# Altium PCB V3.2_Board.PcbDoc (part 2 of 9)
Units mil, origin at the board's own origin, x right, y up, seen from the top; angles counter-clockwise.
Board outline 7795.28 x 4881.89 mil, 2 copper layers (Top Layer, Bottom Layer), stack 57 mil thick; 419 components, 273 nets, 1244 pads, 414 vias.
Unrouted connection lines stored in the file: 3.
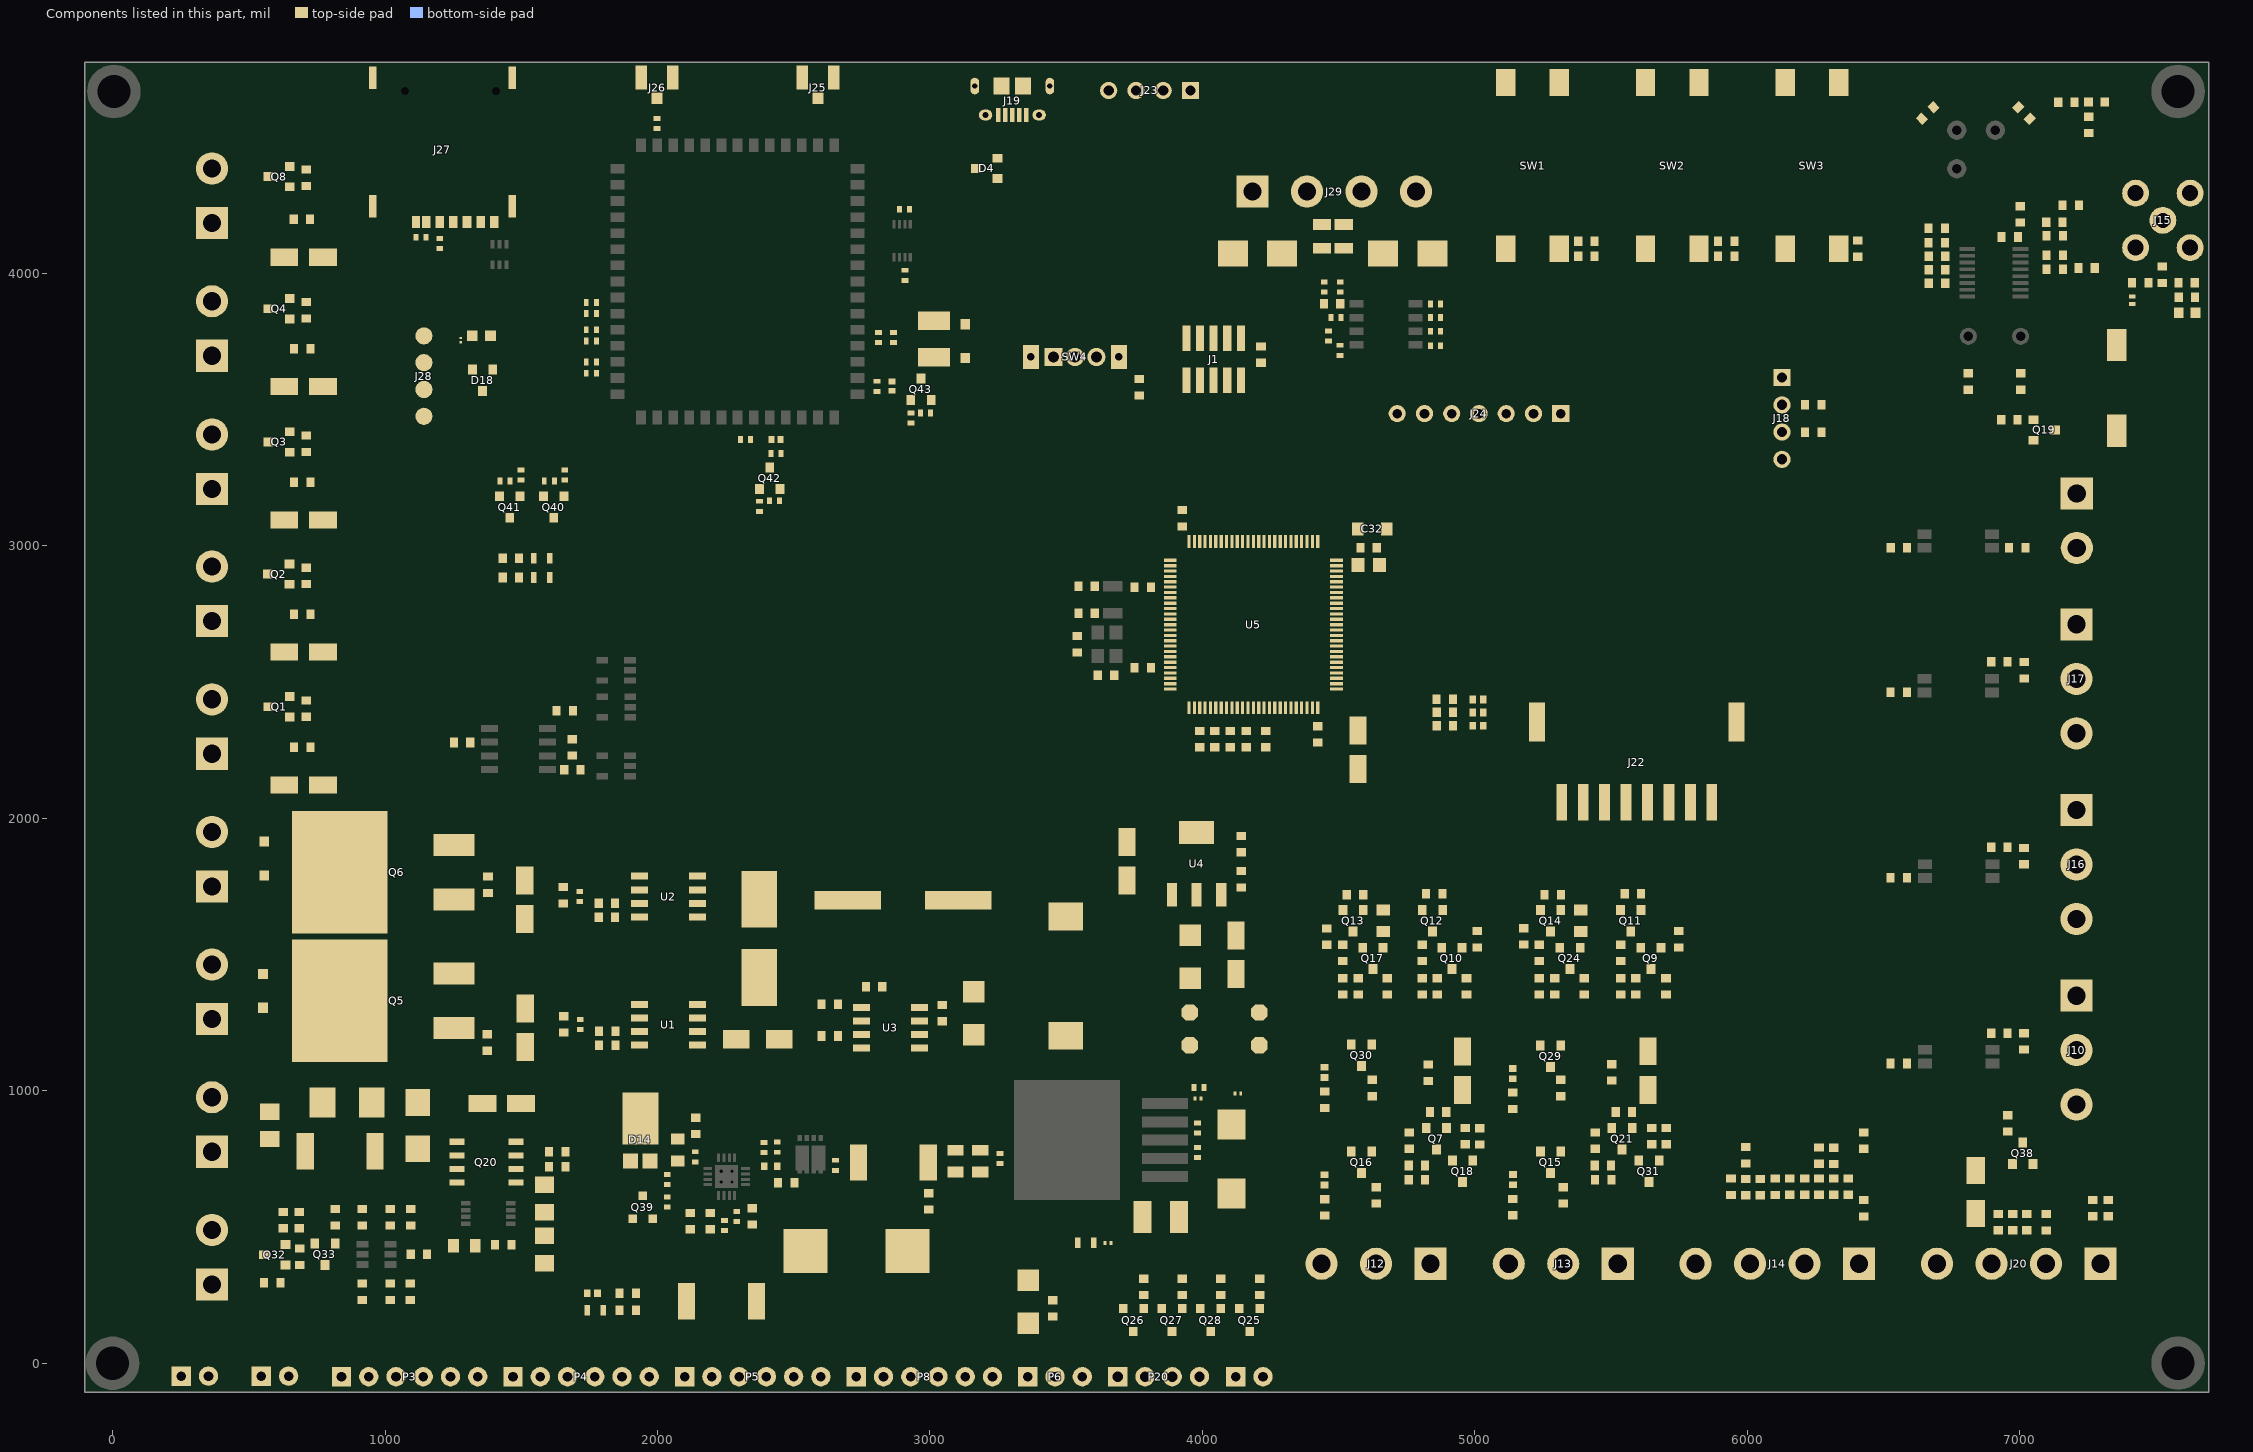
[diagram p2: the components of this part, seen from the top]

## Part data
C1 C4 C17 C21 C23 C24 C31 C43 C58 C61 C63 C65 C67: library part RVT1E100M0405, "CAP ALUM 10uF 25V SMD", Manufacturer=ROQANG, Operating Temperature=-45℃~+105℃, Rated Voltage=25V, Tolerance=±20%, Capacitance=10uF, L=5.4mm, φD=4mm
C2: library part CC1206KKX7R0BB104, "CAP CER 0.1UF 100V X7R 1206", Capacitance=100nF, Case Code (Imperial)=1206, Case Code (Metric)=3216, Dielectric=X7R, Dielectric Material=Ceramic, LCSC Part Number=C107181, Manufacturer=Yageo, Max Operating Temperature=125°C, Min Operating Temperature=-55°C, Package Quantity=1, Tolerance=10%, Voltage=63V, Voltage Rating=100V, Case/Package=1206, Category="Ceramic Capacitors", ComponentLink1Description=https://datasheet.ciiva.com/7978/1447671-7978227.pdf?src-supplier=Element14, ComponentLink1URL=https://datasheet.ciiva.com/7978/1447671-7978227.pdf?src-supplier=Element14, ComponentLink2Description=https://datasheet.ciiva.com/46391/1919308-46391993.pdf?src-supplier=Element14, ComponentLink2URL=https://datasheet.ciiva.com/46391/1919308-46391993.pdf?src-supplier=Element14, ComponentLink3Description=https://datasheet.ciiva.com/180/mlccorderingcode-180145.pdf?src-supplier=Digi-Key, ComponentLink3URL=https://datasheet.ciiva.com/180/mlccorderingcode-180145.pdf?src-supplier=Digi-Key, ComponentLink4Description=https://datasheet.ciiva.com/180/mlccorderingcode-180144.pdf?src-supplier=Digi-Key, ComponentLink4URL=https://datasheet.ciiva.com/180/mlccorderingcode-180144.pdf?src-supplier=Digi-Key, ComponentLink5Description=https://datasheet.ciiva.com/180/mlccorderingcode-180146.pdf?src-supplier=Digi-Key, ComponentLink5URL=https://datasheet.ciiva.com/180/mlccorderingcode-180146.pdf?src-supplier=Digi-Key, ComponentLink6Description=https://datasheet.ciiva.com/5425/upy-gp-np0-16v-to-50v-8-5425573.pdf?src-supplier=Mouser, ComponentLink6URL=https://datasheet.ciiva.com/5425/upy-gp-np0-16v-to-50v-8-5425573.pdf?src-supplier=Mouser, ComponentLink7Description=https://datasheet.ciiva.com/16981/upy-np0x7r-mv-100-to-630v-9-16981180.pdf?src-supplier=Future+Electronics, ComponentLink7URL=https://datasheet.ciiva.com/16981/upy-np0x7r-mv-100-to-630v-9-16981180.pdf?src-supplier=Future+Electronics, ComponentLink8Description=https://datasheet.ciiva.com/26829/getdatasheetpartid-403790-26829655.pdf?src-supplier=Verical, ComponentLink8URL=https://datasheet.ciiva.com/26829/getdatasheetpartid-403790-26829655.pdf?src-supplier=Verical, Depth=1.6mm, Height=1.25mm, Item Type=Capacitor, Lead Free="Lead Free", Length=3.2mm, Manufacturer Part Number=CC1206KKX7R0BB104, Mount="Surface Mount", Number of Pins=2, Packaging="Tape and Reel", Pricing 1="3000=0.01588, 6000=0.01565, 12000=0.01520, 18000=0.01486, 24000=0.01429, 30000=0.01395, 300000=0.01361 (USD)", Radiation Hardening=No, Reach SVHC Compliant=Yes, Resistor Type=Ceramic, RoHS=Yes, RoHS Compliant=Yes, Series=CC, Stock 1=24000, Supplier 1=Avnet, Supplier Part Number 1=CC1206KKX7R0BB104, Termination=SMD/SMT, Thickness=0.057inch, Voltage Rating (DC)=100V, Width=0.063inch
C3 C40 C45 C59: library part CC0603KRX5R8BB105, "CAP CER 1UF 25V X5R 0603", Case Code (Imperial)=0603, Case Code (Metric)=1608, Dielectric=X5R, Manufacturer=Yageo, Max Operating Temperature=85°C, Min Operating Temperature=-55°C, Package Quantity=1, Supplier Part Number 1=311-1445-6-ND, Tolerance=10%, Voltage Rating=25V, Capacitance=1uF, Case/Package=0603, ComponentLink1Description=http://www.yageo.com/documents/recent/UPY-GPHC_X5R_4V-to-50V_25.pdf?src-supplier=Digi-Key, ComponentLink1URL=http://www.yageo.com/documents/recent/UPY-GPHC_X5R_4V-to-50V_25.pdf?src-supplier=Digi-Key, ComponentLink2Description=http://www.yageo.com/documents/recent/UPY-GPHC_X5R_4V-to-50V_12.pdf?src-supplier=Avnet+Europe, ComponentLink2URL=http://www.yageo.com/documents/recent/UPY-GPHC_X5R_4V-to-50V_12.pdf?src-supplier=Avnet+Europe, ComponentLink3Description=http://www.farnell.com/datasheets/1525783.pdf?src-supplier=Element14, ComponentLink3URL=http://www.farnell.com/datasheets/1525783.pdf?src-supplier=Element14, ComponentLink4Description=http://www.yageo.com/documents/recent/UPY-GPHC_X5R_4V-to-50V_12.pdf?src-supplier=Avnet, ComponentLink4URL=http://www.yageo.com/documents/recent/UPY-GPHC_X5R_4V-to-50V_12.pdf?src-supplier=Avnet, Depth=0.8mm, Halogen Free="Halogen Free", Height=0.8mm, Lead Free="Lead Free", Length=1.6mm, Manufacturer Part Number=CC0603KRX5R8BB105, Mount="Surface Mount", Number of Pins=2, Packaging="Tape and Reel", Pricing 1="1=0.1, 10=0.069, 100=0.0307, 500=0.0219, 1000=0.0172 (USD)", Radiation Hardening=No, REACH SVHC="No SVHC", Stock 1=1419041, Supplier 1=Digi-Key, Termination=SMD/SMT, Thickness=0.035inch, Voltage Rating (DC)=25V, Width=0.031inch
C5 C88 C90 C94 C99 C100 C101 C102 C103 C104: library part GRM155R62A104KE14D, "CAP CER 0.1UF 100V X5R 0402", Capacitance=100nF, Case Code (Imperial)=0402, Case Code (Metric)=1005, Dielectric=X5R, LCSC Part Number=C162178, Manufacturer=Murata, Max Operating Temperature=85°C, Min Operating Temperature=-55°C, Package Quantity=10000, Tolerance=10%, Voltage Rating=100V, Case/Package=0402, Category="Ceramic Capacitors", ComponentLink1Description=http://www.farnell.com/datasheets/2079151.pdf?src-supplier=Farnell, ComponentLink1URL=http://www.farnell.com/datasheets/2079151.pdf?src-supplier=Farnell, ComponentLink2Description=http://www.mouser.com/ds/2/281/c02e-2905.pdf?src-supplier=Mouser, ComponentLink2URL=http://www.mouser.com/ds/2/281/c02e-2905.pdf?src-supplier=Mouser, ComponentLink3Description=http://www.farnell.com/datasheets/2079151.pdf?src-supplier=Element14, ComponentLink3URL=http://www.farnell.com/datasheets/2079151.pdf?src-supplier=Element14, ComponentLink4Description=http://search.murata.co.jp/Ceramy/image/img/A01X/G101/ENG/GRM155R62A104KE14-01.pdf?src-supplier=Digi-Key, ComponentLink4URL=http://search.murata.co.jp/Ceramy/image/img/A01X/G101/ENG/GRM155R62A104KE14-01.pdf?src-supplier=Digi-Key, ComponentLink5Description=http://www.farnell.com/datasheets/2079151.pdf?src-supplier=Newark, ComponentLink5URL=http://www.farnell.com/datasheets/2079151.pdf?src-supplier=Newark, Height=0.5mm, Item Type=Capacitor, Lead Free="Lead Free", Length=0.039inch, Manufacturer Part Number=GRM155R62A104KE14D, Mount="Surface Mount", Packaging="Tape and Reel", Pricing 1="10000=0.00500, 20000=0.00410, 30000=0.00390, 50000=0.00370, 100000=0.00300 (USD)", Reach SVHC Compliant=Yes, RoHS=Yes, RoHS Compliant=Yes, Series=GRM, Stock 1=870000, Supplier 1="Arrow Electronics", Supplier Part Number 1=GRM155R62A104KE14D, Termination=SMD/SMT, Thickness=0.022inch, Voltage Rating (DC)=100V, Weight=0.000212oz, Width=0.02inch
C6 C18 C22 C25 C26 C27 C28 C29 C30 C33 C36 C37 C38 C39 C44 C46 C47 C48 C49 C51 C52 C55 C60 C62 C64 C66 C68 C69 C73 C76 C82 C87: library part CC0603ZRY5V9BB104, "CAP CER 0.1UF 50V Y5V 0603", Capacitance=100nF, Case Code (Imperial)=0603, Case Code (Metric)=1608, Dielectric=Y5V, Manufacturer=Yageo, Max Operating Temperature=85°C, Min Operating Temperature=-30°C, Package Quantity=1, Supplier Part Number 1=311-1343-1-ND, Tolerance=80%, Voltage=50V, Case/Package=0603, ComponentLink1Description=http://www.yageo.com/documents/recent/UPY-GPHC_Y5V_6.3V-to-50V_8.pdf?src-supplier=Digi-Key, ComponentLink1URL=http://www.yageo.com/documents/recent/UPY-GPHC_Y5V_6.3V-to-50V_8.pdf?src-supplier=Digi-Key, ComponentLink2Description=http://www.yageo.com/documents/recent/UPY-GPHC_Y5V_6.3V-to-50V_5.pdf?src-supplier=Avnet+Europe, ComponentLink2URL=http://www.yageo.com/documents/recent/UPY-GPHC_Y5V_6.3V-to-50V_5.pdf?src-supplier=Avnet+Europe, ComponentLink3Description=https://www.verical.com/server-webapp/html/getDatasheet?partID=403611&src-supplier=Verical, ComponentLink3URL=https://www.verical.com/server-webapp/html/getDatasheet?partID=403611&src-supplier=Verical, ComponentLink4Description=http://www.mouser.com/ds/2/447/Yageo_UPY-GP_NP0_16V-to-50V_9-358835.pdf?src-supplier=Mouser, ComponentLink4URL=http://www.mouser.com/ds/2/447/Yageo_UPY-GP_NP0_16V-to-50V_9-358835.pdf?src-supplier=Mouser, ComponentLink5Description=http://www.farnell.com/datasheets/1132289.pdf?src-supplier=Element14, ComponentLink5URL=http://www.farnell.com/datasheets/1132289.pdf?src-supplier=Element14, Composition=Ceramic, Depth=0.8mm, Halogen Free="Halogen Free", Height=0.8mm, Lead Free="Lead Free", Length=1.6mm, Manufacturer Part Number=CC0603ZRY5V9BB104, Mount="Surface Mount", Number of Pins=2, Packaging="Tape and Reel", Pricing 1="1=0.1, 10=0.075, 100=0.0334, 500=0.02386, 1000=0.01874 (USD)", Radiation Hardening=No, REACH SVHC="No SVHC", Stock 1=15000880, Supplier 1=Digi-Key, Termination=SMD/SMT, Thickness=0.035inch, Voltage Rating=50V, Voltage Rating (DC)=50V, Width=0.031inch
C9: library part UWX1E101MCL1GB, "CAP ALUM 100UF 20% 25V SMD", Case/Package=Radial, Dielectric Material=Aluminium, Leakage Current=3uA, Manufacturer=Nichicon, Max Operating Temperature=85°C, Min Operating Temperature=-40°C, Package Quantity=1000, Ripple Current=110mA, Supplier Part Number 1=493-2113-6-ND, Tolerance=20%, Voltage=25V, Capacitance=100uF, Category="Aluminum Electrolytic Capacitors", ComponentLink1Description=http://nichicon-us.com/english/products/pdfs/e-uwx.pdf?src-supplier=Digi-Key, ComponentLink1URL=http://nichicon-us.com/english/products/pdfs/e-uwx.pdf?src-supplier=Digi-Key, ComponentLink2Description=http://www.nichicon.co.jp/english/products/pdfs/e-ch_ref.pdf?src-supplier=Mouser, ComponentLink2URL=http://www.nichicon.co.jp/english/products/pdfs/e-ch_ref.pdf?src-supplier=Mouser, ComponentLink3Description=http://www.nichicon.co.jp/english/products/pdfs/e-wx.pdf?src-supplier=Avnet, ComponentLink3URL=http://www.nichicon.co.jp/english/products/pdfs/e-wx.pdf?src-supplier=Avnet, ComponentLink4Description=http://uk.rs-online.com/webdocs/0fa3/0900766b80fa3a90.pdf?src-supplier=RSComponents, ComponentLink4URL=http://uk.rs-online.com/webdocs/0fa3/0900766b80fa3a90.pdf?src-supplier=RSComponents, ComponentLink5Description=http://nichicon-us.com/english/products/pdfs/e-wx.pdf?src-supplier=Future+Electronics, ComponentLink5URL=http://nichicon-us.com/english/products/pdfs/e-wx.pdf?src-supplier=Future+Electronics, ComponentLink6Description=http://www.nichicon.co.jp/english/products/pdfs/e-ch_ref.pdf?src-supplier=Avnet+Europe, ComponentLink6URL=http://www.nichicon.co.jp/english/products/pdfs/e-ch_ref.pdf?src-supplier=Avnet+Europe, ComponentLink7Description=http://www.farnell.com/datasheets/2364658.pdf?src-supplier=Element14, ComponentLink7URL=http://www.farnell.com/datasheets/2364658.pdf?src-supplier=Element14, ComponentLink8Description=https://datasheet.ciiva.com/11778/0900766b80fa3a90-11778418.pdf?src-supplier=RSComponents, ComponentLink8URL=https://datasheet.ciiva.com/11778/0900766b80fa3a90-11778418.pdf?src-supplier=RSComponents, ComponentLink9Description=https://datasheet.ciiva.com/17527/e-wx-17527624.pdf?src-supplier=Avnet+Europe, ComponentLink9URL=https://datasheet.ciiva.com/17527/e-wx-17527624.pdf?src-supplier=Avnet+Europe, ComponentLink10Description=https://datasheet.ciiva.com/5361/e-wx-11809-5361100.pdf?src-supplier=Mouser, ComponentLink10URL=https://datasheet.ciiva.com/5361/e-wx-11809-5361100.pdf?src-supplier=Mouser, ComponentLink11Description=https://datasheet.ciiva.com/28458/1912851-28458684.pdf?src-supplier=Element14, ComponentLink11URL=https://datasheet.ciiva.com/28458/1912851-28458684.pdf?src-supplier=Element14, ComponentLink12Description=https://datasheet.ciiva.com/96/e-wx-96650.pdf?src-supplier=Digi-Key, ComponentLink12URL=https://datasheet.ciiva.com/96/e-wx-96650.pdf?src-supplier=Digi-Key, ComponentLink13Description=https://datasheet.ciiva.com/96/e-wx-96651.pdf?src-supplier=Digi-Key, ComponentLink13URL=https://datasheet.ciiva.com/96/e-wx-96651.pdf?src-supplier=Digi-Key, ComponentLink14Description=https://datasheet.ciiva.com/96/e-wx-96652.pdf?src-supplier=Digi-Key, ComponentLink14URL=https://datasheet.ciiva.com/96/e-wx-96652.pdf?src-supplier=Digi-Key, ComponentLink15Description=https://datasheet.ciiva.com/11687/e-wx-11687148.pdf?src-supplier=Avnet, ComponentLink15URL=https://datasheet.ciiva.com/11687/e-wx-11687148.pdf?src-supplier=Avnet, ComponentLink16Description=https://datasheet.ciiva.com/16512/e-wx-16512638.pdf?src-supplier=Future+Electronics, ComponentLink16URL=https://datasheet.ciiva.com/16512/e-wx-16512638.pdf?src-supplier=Future+Electronics, Construction=Cylindrical, Diameter=8mm, Dissipation Factor=0.14%, Height=5.4mm, Height - Seated (Max)=0.213inch, Lead Diameter=0.8mm, Lead Free="Lead Free", Lead Pitch=2.3mm, Length=5.4mm, Life (Hours)=2000Hour, Manufacturer Part Number=UWX1E101MCL1GB, Mount="Surface Mount", Number of Pins=2, Packaging="Tape and Reel", Polarity=Polar, Pricing 1="1=0.43, 10=0.301, 50=0.211, 100=0.1808, 500=0.13558 (USD)", Pricing 2="1=0.43000, 10=0.30100, 50=0.21100, 100=0.18080, 500=0.13558 (USD)", Radiation Hardening=No, REACH SVHC="No SVHC", Ripple Current (AC)=110mA, RoHS=Yes, RoHS Compliant=Yes, Series=WX, Stock 1=30613, Stock 2=25010, Supplier 1=Digi-Key, Supplier 2=Digi-Key, Supplier Part Number 2=493-2113-1-ND, Termination=SMD/SMT, Voltage Rating=25V, Voltage Rating (DC)=25V, Weight=0.01lb, Width=0.25inch
C11 C19: library part C1005C0G1E102JT000F, "CAP CER 1000PF 25V C0G 0402", LCSC Part Number=C343059, Manufacturer=TDK, Package=0402, ComponentLink1Description=LCSC, ComponentLink1URL=https://www.lcsc.com/product-detail/Multilayer-Ceramic-Capacitors-MLCC-SMD-SMT_TDK-C1005C0G1E102JT000F_C343059.html, Item Type=Capacitor, Manufacturer Part Number=C1005C0G1E102JT000F
C16: library part VT1H471MI135000CE0, "470uF ±20% 50V 12.5mm 13.5mm 1000hrs 105℃ -40℃~+105℃ SMD,12.5x13.5mm Aluminum Electrolytic Capacitors - SMD RoHS", Lifetime @ Temp="1000hrs 105℃", Manufacturer="Changzhou Huawei Elec", Operating Temperature=-40℃~+105℃, Package=SMD,12.5x13.5mm, Rated Voltage=50V, Tolerance=±20%, Capacitance=470uF, L=13.5mm, φD=12.5mm
C20: library part CC0603KRX7R9BB471, "CAP CER 470pF 10% X7R 50V 0603 SMD", Case Code (Imperial)=0603, Case Code (Metric)=1608, Dielectric=X7R, Dielectric Material=Ceramic, Insulation Resistance=10GR, Manufacturer=Yageo, Max Operating Temperature=125°C, Min Operating Temperature=-55°C, Package Quantity=1, Supplier Part Number 1=311-1078-1-ND, Tolerance=10%, Voltage Rating=50V, Capacitance=470pF, Case/Package=0603, Category="Ceramic Capacitors", ComponentLink1Description=https://datasheet.ciiva.com/5425/upy-gphc-x7r-6-3v-to-50v-8-12304-5425461.pdf?src-supplier=Mouser, ComponentLink1URL=https://datasheet.ciiva.com/5425/upy-gphc-x7r-6-3v-to-50v-8-12304-5425461.pdf?src-supplier=Mouser, ComponentLink2Description=https://datasheet.ciiva.com/144/mlccorderingcode-144439.pdf?src-supplier=Digi-Key, ComponentLink2URL=https://datasheet.ciiva.com/144/mlccorderingcode-144439.pdf?src-supplier=Digi-Key, ComponentLink3Description=https://datasheet.ciiva.com/144/mlccorderingcode-144440.pdf?src-supplier=Digi-Key, ComponentLink3URL=https://datasheet.ciiva.com/144/mlccorderingcode-144440.pdf?src-supplier=Digi-Key, ComponentLink4Description=https://datasheet.ciiva.com/11587/upy-gphc-x7r-6-3v-to-50v-8-11587224.pdf?src-supplier=Avnet, ComponentLink4URL=https://datasheet.ciiva.com/11587/upy-gphc-x7r-6-3v-to-50v-8-11587224.pdf?src-supplier=Avnet, ComponentLink5Description=https://datasheet.ciiva.com/144/mlccorderingcode-144441.pdf?src-supplier=Digi-Key, ComponentLink5URL=https://datasheet.ciiva.com/144/mlccorderingcode-144441.pdf?src-supplier=Digi-Key, ComponentLink6Description=https://datasheet.ciiva.com/16623/upy-gphc-x7r-6-3v-to-50v-8-16623897.pdf?src-supplier=Avnet+Europe, ComponentLink6URL=https://datasheet.ciiva.com/16623/upy-gphc-x7r-6-3v-to-50v-8-16623897.pdf?src-supplier=Avnet+Europe, ComponentLink7Description=https://datasheet.ciiva.com/8033/1489800-8033898.pdf?src-supplier=Element14, ComponentLink7URL=https://datasheet.ciiva.com/8033/1489800-8033898.pdf?src-supplier=Element14, ComponentLink8Description=https://datasheet.ciiva.com/8033/1489800-8033899.pdf?src-supplier=Element14, ComponentLink8URL=https://datasheet.ciiva.com/8033/1489800-8033899.pdf?src-supplier=Element14, ComponentLink9Description=https://datasheet.ciiva.com/26829/getdatasheetpartid-251791-26829452.pdf?src-supplier=Verical, ComponentLink9URL=https://datasheet.ciiva.com/26829/getdatasheetpartid-251791-26829452.pdf?src-supplier=Verical, ComponentLink10Description=https://datasheet.ciiva.com/28450/1489800-28450652.pdf?src-supplier=Element14, ComponentLink10URL=https://datasheet.ciiva.com/28450/1489800-28450652.pdf?src-supplier=Element14, ComponentLink11Description=https://datasheet.ciiva.com/8033/70765-8033902.pdf?src-supplier=Element14, ComponentLink11URL=https://datasheet.ciiva.com/8033/70765-8033902.pdf?src-supplier=Element14, Depth=0.8mm, Dissipation Factor=2.5%, Halogen Free="Halogen Free", Height=0.8mm, Lead Free="Lead Free", Length=1.6mm, Manufacturer Part Number=CC0603KRX7R9BB471, Mount="Surface Mount", Number of Pins=2, Packaging="Tape and Reel", Pricing 1="1=0.10000, 10=0.04500, 50=0.02460, 100=0.02010, 500=0.01432, 1000=0.01125 (USD)", Radiation Hardening=No, REACH SVHC="No SVHC", Resistor Type=Ceramic, RoHS=Yes, RoHS Compliant=Yes, Series=CC, Stock 1=2173, Supplier 1=Digi-Key, Termination=SMD/SMT, Thickness=0.035inch, Voltage Rating (DC)=50V, Width=0.8mm
C32: library part T491A105K025AT, "Cap Tant Solid 1uF 25V A CASE 10% (3.2 X 1.6 X 1.6mm) Inward L SMD 3216-18 8 Ohm 125°C T/R", Case Code (Imperial)=1206, Case Code (Metric)=3216, Dielectric Material=Tantalum, ESR (Equivalent Series Resistance)=8R, Leakage Current=500nA, Manufacturer=KEMET, Max Operating Temperature=125°C, Min Operating Temperature=-55°C, Package Quantity=1, Tolerance=20%, Voltage=25V, Capacitance=1uF, Case/Package=1206, Category="Tantalum Capacitors", ComponentLink1Description=https://datasheet.ciiva.com/34302/1573185-34302503.pdf?src-supplier=Jameco, ComponentLink1URL=https://datasheet.ciiva.com/34302/1573185-34302503.pdf?src-supplier=Jameco, ComponentLink2Description=https://datasheet.ciiva.com/7758/1854511-7758878.pdf?src-supplier=Element14, ComponentLink2URL=https://datasheet.ciiva.com/7758/1854511-7758878.pdf?src-supplier=Element14, ComponentLink3Description=https://datasheet.ciiva.com/7758/1446014-7758877.pdf?src-supplier=Element14, ComponentLink3URL=https://datasheet.ciiva.com/7758/1446014-7758877.pdf?src-supplier=Element14, ComponentLink4Description=https://datasheet.ciiva.com/7758/1446014-7758879.pdf?src-supplier=Element14, ComponentLink4URL=https://datasheet.ciiva.com/7758/1446014-7758879.pdf?src-supplier=Element14, ComponentLink5Description=https://datasheet.ciiva.com/5934/1446014-5934519.pdf?src-supplier=Farnell, ComponentLink5URL=https://datasheet.ciiva.com/5934/1446014-5934519.pdf?src-supplier=Farnell, ComponentLink6Description=https://datasheet.ciiva.com/7758/1698764-7758876.pdf?src-supplier=Element14, ComponentLink6URL=https://datasheet.ciiva.com/7758/1698764-7758876.pdf?src-supplier=Element14, ComponentLink7Description=https://datasheet.ciiva.com/257/kem-t2005-t491-257555.pdf?src-supplier=Digi-Key, ComponentLink7URL=https://datasheet.ciiva.com/257/kem-t2005-t491-257555.pdf?src-supplier=Digi-Key, ComponentLink8Description=https://datasheet.ciiva.com/257/kem-t2005-t491-257554.pdf?src-supplier=Digi-Key, ComponentLink8URL=https://datasheet.ciiva.com/257/kem-t2005-t491-257554.pdf?src-supplier=Digi-Key, ComponentLink9Description=https://datasheet.ciiva.com/257/kem-t2005-t491-257556.pdf?src-supplier=Digi-Key, ComponentLink9URL=https://datasheet.ciiva.com/257/kem-t2005-t491-257556.pdf?src-supplier=Digi-Key, ComponentLink10Description=https://datasheet.ciiva.com/14586/70095774-14586698.pdf?src-supplier=Allied+Electronics, ComponentLink10URL=https://datasheet.ciiva.com/14586/70095774-14586698.pdf?src-supplier=Allied+Electronics, ComponentLink11Description=https://datasheet.ciiva.com/18095/getdatasheetpartid-120995-18095948.pdf?src-supplier=Verical, ComponentLink11URL=https://datasheet.ciiva.com/18095/getdatasheetpartid-120995-18095948.pdf?src-supplier=Verical, Depth=1.6mm, Dissipation Factor=4%, Features="General Purpose", Height=1.6mm, Height - Seated (Max)=0.071inch, Lead Free="Lead Free", Lead Pitch=1.2mm, Length=3.2mm, Life (Hours)=2000Hour, Manufacturer Part Number=T491A105K025AT, Mount="Surface Mount,PCB", Number of Pins=2, Packaging="Tape and Reel", Polarity=Polar, Pricing 1="2000=0.09910, 4000=0.09460 (USD)", Radiation Hardening=No, REACH SVHC="No SVHC", RoHS=Yes, RoHS Compliant=Yes, Stock 1=30000, Supplier 1="Arrow Electronics", Supplier Part Number 1=T491A105K025AT, Termination=SMD/SMT, Voltage Rating=25V, Voltage Rating (DC)=25V, Width=1.6mm
C34 C35: library part CC0603JRNPO9BN300, "CAP 30pF NP0 0603 50 V ±5 % SMD", Case Code (Imperial)=0603, Case Code (Metric)=1608, Dielectric=C0G, Insulation Resistance=10GR, Manufacturer=Yageo, Max Operating Temperature=125°C, Min Operating Temperature=-55°C, Resistor Type=Ceramic, Supplier Part Number 1=311-3357-1-ND, Tolerance=5%, Voltage Rating=50V, Capacitance=30pF, Case/Package=0603, Category="Ceramic Capacitors", ComponentLink1Description=https://datasheet.ciiva.com/26862/getdatasheetpartid-403531-26862766.pdf?src-supplier=Verical, ComponentLink1URL=https://datasheet.ciiva.com/26862/getdatasheetpartid-403531-26862766.pdf?src-supplier=Verical, ComponentLink2Description=https://datasheet.ciiva.com/13264/upy-gp-np0-16v-to-50v-8-3714-13264406.pdf?src-supplier=Mouser, ComponentLink2URL=https://datasheet.ciiva.com/13264/upy-gp-np0-16v-to-50v-8-3714-13264406.pdf?src-supplier=Mouser, ComponentLink3Description=https://datasheet.ciiva.com/7978/1132289-7978140.pdf?src-supplier=Element14, ComponentLink3URL=https://datasheet.ciiva.com/7978/1132289-7978140.pdf?src-supplier=Element14, ComponentLink4Description=https://datasheet.ciiva.com/28450/1443161-28450494.pdf?src-supplier=Element14, ComponentLink4URL=https://datasheet.ciiva.com/28450/1443161-28450494.pdf?src-supplier=Element14, Construction=Flat, Depth=0.8mm, Dissipation Factor=0.1%, Height=0.8mm, Lead Free="Lead Free", Length=1.6mm, Manufacturer Part Number=CC0603JRNPO9BN300, Mount="Surface Mount", Number of Pins=2, Packaging="Tape and Reel", Pricing 1="1=0.10000, 10=0.06800, 50=0.03700, 100=0.03020, 500=0.02160, 1000=0.01697 (USD)", Radiation Hardening=No, REACH SVHC="No SVHC", RoHS=Yes, RoHS Compliant=Yes, Series=CC, Stock 1=36700, Supplier 1=Digi-Key, Termination=SMD/SMT, Thickness=0.035inch, Voltage Rating (DC)=50V, Weight=7.1E-05oz, Width=0.031inch
C41 C80 C81 C83 C86: library part UMK105CBJ105MV-F, "CAP CER 1UF 50V X5R 0402", Manufacturer="Taiyo Yuden", Supplier Part Number 1=587-6278-1-ND, ComponentLink1Description=http://www.farnell.com/datasheets/2801300.pdf?src-supplier=Newark, ComponentLink1URL=http://www.farnell.com/datasheets/2801300.pdf?src-supplier=Newark, ComponentLink2Description=http://www.farnell.com/datasheets/2801300.pdf?src-supplier=Farnell, ComponentLink2URL=http://www.farnell.com/datasheets/2801300.pdf?src-supplier=Farnell, ComponentLink3Description="https://ds.yuden.co.jp/TYCOMPAS/ut/detail?pn=UMK105CBJ105MV-F &amp;u=M&src-supplier=Digi-Key", ComponentLink3URL="https://ds.yuden.co.jp/TYCOMPAS/ut/detail?pn=UMK105CBJ105MV-F &amp;u=M&src-supplier=Digi-Key", Lead Free="Lead Free", Manufacturer Part Number=UMK105CBJ105MV-F, Pricing 1="1=0.27, 10=0.184, 50=0.1224, 100=0.104, 500=0.07342, 1000=0.06424, 2500=0.06118, 5000=0.05659 (USD)", RoHS Compliant=Yes, Stock 1=412061, Supplier 1=Digi-Key
C42 C79: library part CC0603KRX5R8BB105, "CAP CER 1UF 25V X5R 0603", Case Code (Imperial)=0603, Case Code (Metric)=1608, Dielectric=X5R, LCSC Part Number=C14664, Manufacturer=Yageo, Max Operating Temperature=85°C, Min Operating Temperature=-55°C, Package Quantity=1, Supplier Part Number 1=311-1445-1-ND, Tolerance=10%, Voltage Rating=25V, Capacitance=1uF, Case/Package=0603, Category="Ceramic Capacitors", ComponentLink1Description=https://datasheet.ciiva.com/176/mlccorderingcode-176785.pdf?src-supplier=Digi-Key, ComponentLink1URL=https://datasheet.ciiva.com/176/mlccorderingcode-176785.pdf?src-supplier=Digi-Key, ComponentLink2Description=https://datasheet.ciiva.com/176/mlccorderingcode-176786.pdf?src-supplier=Digi-Key, ComponentLink2URL=https://datasheet.ciiva.com/176/mlccorderingcode-176786.pdf?src-supplier=Digi-Key, ComponentLink3Description=https://datasheet.ciiva.com/176/mlccorderingcode-176787.pdf?src-supplier=Digi-Key, ComponentLink3URL=https://datasheet.ciiva.com/176/mlccorderingcode-176787.pdf?src-supplier=Digi-Key, ComponentLink4Description=https://datasheet.ciiva.com/17436/upy-gphc-x5r-4v-to-50v-12-17436952.pdf?src-supplier=Avnet+Europe, ComponentLink4URL=https://datasheet.ciiva.com/17436/upy-gphc-x5r-4v-to-50v-12-17436952.pdf?src-supplier=Avnet+Europe, ComponentLink5Description=https://datasheet.ciiva.com/7978/1525783-7978171.pdf?src-supplier=Element14, ComponentLink5URL=https://datasheet.ciiva.com/7978/1525783-7978171.pdf?src-supplier=Element14, ComponentLink6Description=https://datasheet.ciiva.com/11586/upy-gphc-x5r-4v-to-50v-12-11586318.pdf?src-supplier=Avnet, ComponentLink6URL=https://datasheet.ciiva.com/11586/upy-gphc-x5r-4v-to-50v-12-11586318.pdf?src-supplier=Avnet, Construction=Flat, Depth=0.8mm, Halogen Free="Halogen Free", Height=0.8mm, Lead Free="Lead Free", Length=1.6mm, Manufacturer Part Number=CC0603KRX5R8BB105, Mount="Surface Mount", Number of Pins=2, Packaging="Tape and Reel", Pricing 1="1=0.12000, 10=0.08400, 50=0.04760, 100=0.03940, 500=0.02764, 1000=0.02288 (USD)", Radiation Hardening=No, REACH SVHC="No SVHC", RoHS=Yes, RoHS Compliant=Yes, Series=CC, Stock 1=919939, Supplier 1=Digi-Key, Termination=SMD/SMT, Thickness=0.035inch, Voltage Rating (DC)=25V, Width=0.031inch
C50 C54: library part CC0603ZRY5V9BB104, "CAP CER 0.1UF 50V Y5V 0603", Capacitance=100nF, Case Code (Imperial)=0603, Case Code (Metric)=1608, Dielectric=Y5V, LCSC Part Number=C106221, Manufacturer=Yageo, Max Operating Temperature=85°C, Min Operating Temperature=-30°C, Package Quantity=1, Supplier Part Number 1=311-1343-1-ND, Tolerance=80%, Voltage=50V, Case/Package=0603, ComponentLink1Description=http://www.yageo.com/documents/recent/UPY-GPHC_Y5V_6.3V-to-50V_8.pdf?src-supplier=Digi-Key, ComponentLink1URL=http://www.yageo.com/documents/recent/UPY-GPHC_Y5V_6.3V-to-50V_8.pdf?src-supplier=Digi-Key, ComponentLink2Description=http://www.yageo.com/documents/recent/UPY-GPHC_Y5V_6.3V-to-50V_5.pdf?src-supplier=Avnet+Europe, ComponentLink2URL=http://www.yageo.com/documents/recent/UPY-GPHC_Y5V_6.3V-to-50V_5.pdf?src-supplier=Avnet+Europe, ComponentLink3Description=https://www.verical.com/server-webapp/html/getDatasheet?partID=403611&src-supplier=Verical, ComponentLink3URL=https://www.verical.com/server-webapp/html/getDatasheet?partID=403611&src-supplier=Verical, ComponentLink4Description=http://www.mouser.com/ds/2/447/Yageo_UPY-GP_NP0_16V-to-50V_9-358835.pdf?src-supplier=Mouser, ComponentLink4URL=http://www.mouser.com/ds/2/447/Yageo_UPY-GP_NP0_16V-to-50V_9-358835.pdf?src-supplier=Mouser, ComponentLink5Description=http://www.farnell.com/datasheets/1132289.pdf?src-supplier=Element14, ComponentLink5URL=http://www.farnell.com/datasheets/1132289.pdf?src-supplier=Element14, Composition=Ceramic, Depth=0.8mm, Halogen Free="Halogen Free", Height=0.8mm, Item Type=Capacitor, Lead Free="Lead Free", Length=1.6mm, Manufacturer Part Number=CC0603ZRY5V9BB104, Mount="Surface Mount", Number of Pins=2, Packaging="Tape and Reel", Pricing 1="1=0.1, 10=0.075, 100=0.0334, 500=0.02386, 1000=0.01874 (USD)", Radiation Hardening=No, REACH SVHC="No SVHC", Stock 1=15000880, Supplier 1=Digi-Key, Termination=SMD/SMT, Thickness=0.035inch, Voltage Rating=50V, Voltage Rating (DC)=50V, Width=0.031inch
C53 C78: library part CC0603JRNPO9BN200, "CAP CER 20PF 50V C0G/NPO 0603", Case Code (Imperial)=0603, Case Code (Metric)=1608, Dielectric=C0G, Manufacturer=Yageo, Max Operating Temperature=125°C, Min Operating Temperature=-55°C, Package Quantity=4000, Supplier Part Number 1=311-1424-1-ND, Tolerance=5%, Voltage Rating=50V, Capacitance=20pF, Case/Package=0603, ComponentLink1Description=http://www.farnell.com/datasheets/1132289.pdf?src-supplier=Element14, ComponentLink1URL=http://www.farnell.com/datasheets/1132289.pdf?src-supplier=Element14, ComponentLink2Description=http://www.yageo.com/documents/recent/UPY-GP_NP0_16V-to-50V_16.pdf?src-supplier=Digi-Key, ComponentLink2URL=http://www.yageo.com/documents/recent/UPY-GP_NP0_16V-to-50V_16.pdf?src-supplier=Digi-Key, Composition=Ceramic, Depth=0.8mm, Lead Free="Lead Free", Length=1.6mm, Manufacturer Part Number=CC0603JRNPO9BN200, Mount="Surface Mount", Number of Pins=2, Packaging="Tape and Reel", Pricing 1="1=0.1, 10=0.046, 100=0.0205, 500=0.01466, 1000=0.01152 (USD)", REACH SVHC=Unknown, Stock 1=180060, Supplier 1=Digi-Key, Termination=SMD/SMT, Thickness=0.035inch, Voltage Rating (DC)=50V, Weight=7.1E-05oz, Width=0.8mm
C56: library part CC1206JRX7R0BB473, "CAP CER 0.047UF 100V X7R 1206", Capacitance=47nF, Case Code (Imperial)=1206, Case Code (Metric)=3216, Dielectric=X7R, LCSC Part Number=C577197, Manufacturer=Yageo, Max Operating Temperature=125°C, Min Operating Temperature=-55°C, Resistor Type=Ceramic, Tolerance=5%, Voltage Rating=100V, Case/Package=1206, Category="Ceramic Capacitors", ComponentLink1Description=https://datasheet.ciiva.com/11465/upy-np0x7r-mv-100-to-630v-9-11465413.pdf?src-supplier=Avnet, ComponentLink1URL=https://datasheet.ciiva.com/11465/upy-np0x7r-mv-100-to-630v-9-11465413.pdf?src-supplier=Avnet, ComponentLink2Description=https://datasheet.ciiva.com/13210/upy-gp-np0-16v-to-50v-8-13210277.pdf?src-supplier=Mouser, ComponentLink2URL=https://datasheet.ciiva.com/13210/upy-gp-np0-16v-to-50v-8-13210277.pdf?src-supplier=Mouser, Construction=Flat, Depth=1.6mm, Height=0.85mm, Item Type=Capacitor, Length=3.2mm, Manufacturer Part Number=CC1206JRX7R0BB473, Mount="Surface Mount", Packaging="Tape and Reel", Pricing 1="1=0.21620, 10=0.10530, 25=0.10420, 100=0.08480, 250=0.08390, 500=0.05860, 1000=0.05090, 3000=0.04900, 6000=0.02930 (USD)", Radiation Hardening=No, RoHS=Yes, RoHS Compliant=Yes, Series=CC, Stock 1=6600, Supplier 1="Arrow Electronics", Supplier Part Number 1=CC1206JRX7R0BB473, Termination=SMD/SMT, Thickness=0.037inch, Voltage Rating (DC)=100V, Width=1.6mm
C57: library part GRM188R6YA106MA73D, "CAP CER 10UF 35V X5R 0603", Case Code (Imperial)=0603, Case Code (Metric)=1608, Dielectric=X5R, Manufacturer=Murata, Max Operating Temperature=85°C, Min Operating Temperature=-55°C, Tolerance=20%, Voltage Rating=35V, Capacitance=10uF, Case/Package=0603, Category="Ceramic Capacitors", ComponentLink1Description=http://search.murata.co.jp/Ceramy/image/img/A01X/G101/ENG/GRM188R6YA106MA73-01.pdf?src-supplier=Future+Electronics, ComponentLink1URL=http://search.murata.co.jp/Ceramy/image/img/A01X/G101/ENG/GRM188R6YA106MA73-01.pdf?src-supplier=Future+Electronics, ComponentLink2Description=http://search.murata.co.jp/Ceramy/image/img/A01X/G101/ENG/GRM188R6YA106MA73-01.pdf?src-supplier=Digi-Key, ComponentLink2URL=http://search.murata.co.jp/Ceramy/image/img/A01X/G101/ENG/GRM188R6YA106MA73-01.pdf?src-supplier=Digi-Key, ComponentLink3Description=https://www.murata.com/~/media/webrenewal/support/library/catalog/products/capacitor/mlcc/c02e.ashx?la=en-us&src-supplier=Digi-Key, ComponentLink3URL=https://www.murata.com/~/media/webrenewal/support/library/catalog/products/capacitor/mlcc/c02e.ashx?la=en-us&src-supplier=Digi-Key, ComponentLink4Description=http://search.murata.co.jp/Ceramy/image/img/A01X/G101/ENG/GRM188R6YA106MA73-01.pdf?src-supplier=Mouser, ComponentLink4URL=http://search.murata.co.jp/Ceramy/image/img/A01X/G101/ENG/GRM188R6YA106MA73-01.pdf?src-supplier=Mouser, ComponentLink5Description=http://search.murata.co.jp/Ceramy/image/img/A01X/G101/ENG/GRM188R6YA106MA73-01.pdf?src-supplier=TTI, ComponentLink5URL=http://search.murata.co.jp/Ceramy/image/img/A01X/G101/ENG/GRM188R6YA106MA73-01.pdf?src-supplier=TTI, Length=0.063inch, Manufacturer Part Number=GRM188R6YA106MA73D, Mount="Surface Mount", Packaging="Tape and Reel", Pricing 1="1=0.36820, 10=0.23680, 25=0.23460, 100=0.15100, 250=0.14950, 500=0.10790, 1000=0.09360, 3000=0.08750, 6000=0.07770, 15000=0.07250, 30000=0.06740 (USD)", RoHS=Yes, RoHS Compliant=Yes, Stock 1=38881, Supplier 1="Arrow Electronics", Supplier Part Number 1=GRM188R6YA106MA73D, Thickness=0.039inch, Voltage Rating (DC)=35V, Width=0.031inch
C70: library part UMK107B7474KA-TR, "CAP CER 0.47uF 50V X7R 0603", Capacitance=470nF, Case Code (Imperial)=0603, Case Code (Metric)=1608, Dielectric=X7R, Manufacturer="Taiyo Yuden", Max Operating Temperature=125°C, Min Operating Temperature=-55°C, Package Quantity=1, Supplier Part Number 1=587-3170-1-ND, Tolerance=10%, Voltage=50V, Case/Package=0603, Category="Ceramic Capacitors", ComponentLink1Description=https://datasheet.ciiva.com/30063/972umk107b7474ka-tr-30063804.pdf?src-supplier=Onlinecomponents.com, ComponentLink1URL=https://datasheet.ciiva.com/30063/972umk107b7474ka-tr-30063804.pdf?src-supplier=Onlinecomponents.com, ComponentLink2Description=https://datasheet.ciiva.com/11600/umk107b7474ka-tr-ss-11600367.pdf?src-supplier=Avnet, ComponentLink2URL=https://datasheet.ciiva.com/11600/umk107b7474ka-tr-ss-11600367.pdf?src-supplier=Avnet, ComponentLink3Description=https://datasheet.ciiva.com/15922/257umk107b7474ka-tr-15922607.pdf?src-supplier=Onlinecomponents.com, ComponentLink3URL=https://datasheet.ciiva.com/15922/257umk107b7474ka-tr-15922607.pdf?src-supplier=Onlinecomponents.com, ComponentLink4Description=https://datasheet.ciiva.com/6274/mlcc-all-e-6274710.pdf?src-supplier=Digi-Key, ComponentLink4URL=https://datasheet.ciiva.com/6274/mlcc-all-e-6274710.pdf?src-supplier=Digi-Key, ComponentLink5Description=https://datasheet.ciiva.com/5412/mlcc01-e-5412119.pdf?src-supplier=Mouser, ComponentLink5URL=https://datasheet.ciiva.com/5412/mlcc01-e-5412119.pdf?src-supplier=Mouser, ComponentLink6Description=https://datasheet.ciiva.com/6274/mlcc-all-e-6274712.pdf?src-supplier=Digi-Key, ComponentLink6URL=https://datasheet.ciiva.com/6274/mlcc-all-e-6274712.pdf?src-supplier=Digi-Key, ComponentLink7Description=https://datasheet.ciiva.com/6274/mlcc-all-e-6274713.pdf?src-supplier=Digi-Key, ComponentLink7URL=https://datasheet.ciiva.com/6274/mlcc-all-e-6274713.pdf?src-supplier=Digi-Key, Construction=Flat, Depth=0.8mm, Halogen Free="Halogen Free", Height=0.8mm, Lead Free="Lead Free", Length=1.6mm, Manufacturer Part Number=UMK107B7474KA-TR, Mount="Surface Mount", Packaging="Tape and Reel", Pricing 1="1=0.21000, 10=0.14800, 50=0.08400, 100=0.06950, 500=0.04876, 1000=0.04036 (USD)", Radiation Hardening=No, RoHS=Yes, RoHS Compliant=Yes, Series=M, Stock 1=81, Supplier 1=Digi-Key, Termination=SMD/SMT, Thickness=0.035inch, Voltage Rating=50V, Voltage Rating (DC)=50V, Width=0.031inch
C71 C72: library part CC0603JRNPO9BN200, "CAP CER 20PF 50V C0G/NPO 0603", Case Code (Imperial)=0603, Case Code (Metric)=1608, Dielectric=C0G, LCSC Part Number=C105621, Manufacturer=Yageo, Max Operating Temperature=125°C, Min Operating Temperature=-55°C, Package Quantity=4000, Supplier Part Number 1=311-1424-6-ND, Tolerance=5%, Voltage Rating=50V, Capacitance=20pF, Case/Package=0603, ComponentLink1Description=http://www.farnell.com/datasheets/1132289.pdf?src-supplier=Element14, ComponentLink1URL=http://www.farnell.com/datasheets/1132289.pdf?src-supplier=Element14, ComponentLink2Description=http://www.yageo.com/documents/recent/UPY-GP_NP0_16V-to-50V_16.pdf?src-supplier=Digi-Key, ComponentLink2URL=http://www.yageo.com/documents/recent/UPY-GP_NP0_16V-to-50V_16.pdf?src-supplier=Digi-Key, Composition=Ceramic, Depth=0.8mm, Lead Free="Lead Free", Length=1.6mm, Manufacturer Part Number=CC0603JRNPO9BN200, Mount="Surface Mount", Number of Pins=2, Packaging="Tape and Reel", Pricing 1="1=0.1, 10=0.048, 100=0.0214, 500=0.01526, 1000=0.01198 (USD)", REACH SVHC=Unknown, Stock 1=259568, Supplier 1=Digi-Key, Termination=SMD/SMT, Thickness=0.035inch, Voltage Rating (DC)=50V, Weight=7.1E-05oz, Width=0.8mm
C74: library part CC0603CRNPO9BN1R2, "CAP CER 1.2PF 50V C0G/NPO 0603", Case Code (Imperial)=0603, Case Code (Metric)=1608, Dielectric=C0G, Insulation Resistance=10GR, Manufacturer=Yageo, Max Operating Temperature=125°C, Min Operating Temperature=-55°C, Package Quantity=4000, Resistor Type=Ceramic, Voltage Rating=50V, Capacitance=1.2pF, Case/Package=0603, Category="Ceramic Capacitors", ComponentLink1Description=https://datasheet.ciiva.com/26862/getdatasheetpartid-403496-26862685.pdf?src-supplier=Verical, ComponentLink1URL=https://datasheet.ciiva.com/26862/getdatasheetpartid-403496-26862685.pdf?src-supplier=Verical, ComponentLink2Description=https://datasheet.ciiva.com/13209/upy-gp-np0-16v-to-50v-8-13209833.pdf?src-supplier=Mouser, ComponentLink2URL=https://datasheet.ciiva.com/13209/upy-gp-np0-16v-to-50v-8-13209833.pdf?src-supplier=Mouser, ComponentLink3Description=https://datasheet.ciiva.com/8033/1443161-8033679.pdf?src-supplier=Element14, ComponentLink3URL=https://datasheet.ciiva.com/8033/1443161-8033679.pdf?src-supplier=Element14, ComponentLink4Description=https://datasheet.ciiva.com/8033/1443161-8033677.pdf?src-supplier=Element14, ComponentLink4URL=https://datasheet.ciiva.com/8033/1443161-8033677.pdf?src-supplier=Element14, ComponentLink5Description=https://datasheet.ciiva.com/11586/upy-gp-np0-16v-to-50v-8-11586438.pdf?src-supplier=Avnet, ComponentLink5URL=https://datasheet.ciiva.com/11586/upy-gp-np0-16v-to-50v-8-11586438.pdf?src-supplier=Avnet, Depth=0.8mm, Height=0.8mm, Lead Free="Lead Free", Length=1.6mm, Manufacturer Part Number=CC0603CRNPO9BN1R2, Mount="Surface Mount", Packaging="Tape and Reel", Pricing 1="4000=0.00980, 8000=0.00850, 12000=0.00840, 40000=0.00420 (USD)", Radiation Hardening=No, REACH SVHC="No SVHC", RoHS=Yes, RoHS Compliant=Yes, Series=CC, Stock 1=8000, Supplier 1="Arrow Electronics", Supplier Part Number 1=CC0603CRNPO9BN1R2, Termination=SMD/SMT, Thickness=0.035inch, Voltage Rating (DC)=50V, Weight=7.1E-05oz, Width=0.031inch
C75: library part UMK107BBJ225MA-T, "CAP CER 2.2UF 50V X5R 0603", Manufacturer="Taiyo Yuden", Supplier Part Number 1=587-6298-1-ND, Category="Ceramic Capacitors", Manufacturer Part Number=UMK107BBJ225MA-T, Pricing 1="1=0.26000, 10=0.18100, 50=0.12060, 100=0.10240, 500=0.07232, 1000=0.06327 (USD)", RoHS=Yes, RoHS Compliant=Yes, Stock 1=1, Supplier 1=Digi-Key
C77: library part CC0603CRNPO9BN1R5, "CAP CER 1.5PF 50V C0G/NPO 0603", Case Code (Imperial)=0603, Case Code (Metric)=1608, Dielectric=C0G, Insulation Resistance=10GR, Manufacturer=Yageo, Max Operating Temperature=125°C, Min Operating Temperature=-55°C, Package Quantity=1, Supplier Part Number 1=311-1050-6-ND, Temperature Coefficient=30ppm/°C, Voltage=50V, Capacitance=1.5pF, Case/Package=0603, ComponentLink1Description=http://www.yageo.com/documents/recent/UPY-GP_NP0_16V-to-50V_16.pdf?src-supplier=Digi-Key, ComponentLink1URL=http://www.yageo.com/documents/recent/UPY-GP_NP0_16V-to-50V_16.pdf?src-supplier=Digi-Key, ComponentLink2Description=http://www.yageo.com/exep/pages/download/literatures/ProductSelectionGuide%202014_Final_2.pdf?src-supplier=Digi-Key, ComponentLink2URL=http://www.yageo.com/exep/pages/download/literatures/ProductSelectionGuide%202014_Final_2.pdf?src-supplier=Digi-Key, ComponentLink3Description=http://www.mouser.com/ds/2/447/Yageo_UPY-GP_NP0_16V-to-50V_9-358835.pdf?src-supplier=Mouser, ComponentLink3URL=http://www.mouser.com/ds/2/447/Yageo_UPY-GP_NP0_16V-to-50V_9-358835.pdf?src-supplier=Mouser, ComponentLink4Description=http://www.yageo.com/documents/recent/UPY-GP_NP0_16V-to-50V_8.pdf?src-supplier=Avnet, ComponentLink4URL=http://www.yageo.com/documents/recent/UPY-GP_NP0_16V-to-50V_8.pdf?src-supplier=Avnet, ComponentLink5Description=http://www.yageo.com/documents/recent/UPY-GP_NP0_16V-to-50V_8.pdf?src-supplier=Avnet+Europe, ComponentLink5URL=http://www.yageo.com/documents/recent/UPY-GP_NP0_16V-to-50V_8.pdf?src-supplier=Avnet+Europe, ComponentLink6Description=https://www.verical.com/server-webapp/html/getDatasheet?partID=38063&src-supplier=Verical, ComponentLink6URL=https://www.verical.com/server-webapp/html/getDatasheet?partID=38063&src-supplier=Verical, Composition=Ceramic, Depth=0.8mm, Height=0.8mm, Lead Free="Lead Free", Length=1.6mm, Manufacturer Part Number=CC0603CRNPO9BN1R5, Mount="Surface Mount", Packaging="Tape and Reel", Pricing 1="1=0.1, 10=0.058, 100=0.0259, 500=0.01852, 1000=0.01455 (USD)", Radiation Hardening=No, REACH SVHC=Unknown, Stock 1=34794, Supplier 1=Digi-Key, Termination=SMD/SMT, Thickness=0.035inch, Voltage Rating=50V, Voltage Rating (DC)=50V, Weight=7.1E-05oz, Width=0.031inch
C84 C85: library part C2012X5R1V226MT000E, "CAP CER 22UF 35V X5R 0805", LCSC Part Number=C338080, Manufacturer="TDK Corporation", Package=0805, ComponentLink1Description=LCSC, ComponentLink1URL=https://www.lcsc.com/product-detail/Multilayer-Ceramic-Capacitors-MLCC-SMD-SMT_TDK-C2012X5R1V226M125AC_C2179409.html, Item Type=Capacitor, Manufacturer Part Number=C2012X5R1V226MT000E
C89: library part TAJE337M016RNJ, "CAP TANT 330UF 20% 16V 2917", Case Code (Imperial)=2917, Case Code (Metric)=7343, ESR (Equivalent Series Resistance)=400mR, LCSC Part Number=C51599, Leakage Current=52.8uA, Manufacturer="Kyocera AVX", Max Operating Temperature=125°C, Min Operating Temperature=-55°C, Tolerance=20%, Voltage Rating=16V, Case/Package=2917, Category="Tantalum Capacitors", ComponentLink1Description=https://datasheet.ciiva.com/12882/taj-27497-12882412.pdf?src-supplier=Mouser, ComponentLink1URL=https://datasheet.ciiva.com/12882/taj-27497-12882412.pdf?src-supplier=Mouser, Dissipation Factor=30%, Features="General Purpose", Height=4.3mm, Item Type=Capacitor, Lead Free="Lead Free", Length=7.3mm, Manufacturer Part Number=TAJE337M016RNJ, Mounting Technology="Surface Mount", Packaging="Tape and Reel", Pricing 1="400=1.8678, 2000=1.7998, 4000=1.7657, 6000=1.7481, 10000=1.7306, 30000=1.7133, 50000=1.6961 (USD)", RoHS=Yes, RoHS Compliant=Yes, Series=TAJ, Stock 1=4000, Supplier 1="Arrow Electronics", Supplier Part Number 1=TAJE337M016RNJ, Termination=SMD/SMT, Voltage Rating (DC)=16V, Width=4.3mm
C91: library part TAJB107M010RNJ, "CAP TANT 100UF 20% 10V 1411", Case Code (Imperial)=1210, Case Code (Metric)=3528, Dielectric Material=Tantalum, ESR (Equivalent Series Resistance)=1.4R, LCSC Part Number=C7196, Leakage Current=10uA, Manufacturer="Kyocera AVX", Max Operating Temperature=125°C, Min Operating Temperature=-55°C, Package Quantity=2000, Supplier Part Number 1=1354069, Tolerance=10%, Voltage=10V, Case/Package=1210, Category="Tantalum Capacitors", ComponentLink1Description=https://datasheet.ciiva.com/264/taj-264281.pdf?src-supplier=Digi-Key, ComponentLink1URL=https://datasheet.ciiva.com/264/taj-264281.pdf?src-supplier=Digi-Key, ComponentLink2Description=https://datasheet.ciiva.com/264/taj-264280.pdf?src-supplier=Digi-Key, ComponentLink2URL=https://datasheet.ciiva.com/264/taj-264280.pdf?src-supplier=Digi-Key, ComponentLink3Description=https://datasheet.ciiva.com/264/taj-264282.pdf?src-supplier=Digi-Key, ComponentLink3URL=https://datasheet.ciiva.com/264/taj-264282.pdf?src-supplier=Digi-Key, ComponentLink4Description=https://datasheet.ciiva.com/11225/taj-11225964.pdf?src-supplier=Avnet, ComponentLink4URL=https://datasheet.ciiva.com/11225/taj-11225964.pdf?src-supplier=Avnet, ComponentLink5Description=https://datasheet.ciiva.com/11225/taj-11225963.pdf?src-supplier=Avnet, ComponentLink5URL=https://datasheet.ciiva.com/11225/taj-11225963.pdf?src-supplier=Avnet, Construction=Flat, Depth=2.8mm, Dissipation Factor=8%, Features="General Purpose", Height=2.1mm, Item Type=Capacitor, Lead Free="Lead Free", Length=3.5mm, Manufacturer Part Number=TAJB107M010RNJ, Mounting Technology="Surface Mount", Packaging="Tape and Reel", Pricing 1="2000=0.302 (GBP)", Radiation Hardening=No, Reach SVHC Compliant=No, RoHS=Yes, RoHS Compliant=Yes, Series=TAJ, Stock 1=17520, Supplier 1=Rs, Termination=SMD/SMT, Voltage Rating=10V, Voltage Rating (DC)=10V, Width=2.8mm
C92: library part GRM1555C1E330JA01D, "CAP CER 33PF 25V C0G/NP0 0402", Case Code (Imperial)=0402, Case Code (Metric)=1005, Dielectric=C0G, LCSC Part Number=C441758, Manufacturer=Murata, Max Operating Temperature=125°C, Min Operating Temperature=-55°C, Package Quantity=1, Supplier Part Number 1=490-6177-1-ND, Tolerance=5%, Voltage=25V, Capacitance=33pF, Case/Package=0402, ComponentLink1Description=https://www.murata.com/~/media/webrenewal/support/library/catalog/products/capacitor/mlcc/c02e.ashx?la=en-us&src-supplier=Digi-Key, ComponentLink1URL=https://www.murata.com/~/media/webrenewal/support/library/catalog/products/capacitor/mlcc/c02e.ashx?la=en-us&src-supplier=Digi-Key, ComponentLink2Description=http://www.mouser.com/ds/2/281/c02e-2905.pdf?src-supplier=Mouser, ComponentLink2URL=http://www.mouser.com/ds/2/281/c02e-2905.pdf?src-supplier=Mouser, ComponentLink3Description=http://psearch.murata.com/capacitor/product/GRM1555C1E330JA01%23.pdf?src-supplier=Avnet, ComponentLink3URL=http://psearch.murata.com/capacitor/product/GRM1555C1E330JA01%23.pdf?src-supplier=Avnet, Construction=Flat, Depth=0.5mm, Height=0.5mm, Lead Free="Lead Free", Length=1mm, Manufacturer Part Number=GRM1555C1E330JA01D, Mount="Surface Mount", Packaging="Tape and Reel", Pricing 1="1=0.1, 10=0.034, 50=0.0184, 100=0.0151, 500=0.01078, 1000=0.00847, 2500=0.0077, 5000=0.00708 (USD)", Radiation Hardening=No, RoHS Compliant=Yes, Series=GRM, Stock 1=250773, Supplier 1=Digi-Key, Termination=SMD/SMT, Thickness=0.022inch, Voltage Rating=25V, Voltage Rating (DC)=25V, Width=0.02inch
C93: library part TLJB227M006R0500, "CAP TANT 220UF 20% 6.3V SMD", Case Code (Imperial)=1411, Case Code (Metric)=3528, Case/Package=1210, Dielectric Material=Tantalum, ESR (Equivalent Series Resistance)=500mR, LCSC Part Number=C30242, Leakage Current=13.2uA, Manufacturer="Kyocera AVX", Max Operating Temperature=125°C, Min Operating Temperature=-55°C, Package Quantity=2000, Ripple Current=412mA, Tolerance=20%, Voltage Rating=6.3V, Category="Tantalum Capacitors", ComponentLink1Description=https://datasheet.ciiva.com/7773/tlj-7773835.pdf?src-supplier=Element14, ComponentLink1URL=https://datasheet.ciiva.com/7773/tlj-7773835.pdf?src-supplier=Element14, ComponentLink2Description=https://datasheet.ciiva.com/7773/tlj-7773836.pdf?src-supplier=Element14, ComponentLink2URL=https://datasheet.ciiva.com/7773/tlj-7773836.pdf?src-supplier=Element14, ComponentLink3Description=https://datasheet.ciiva.com/12911/tlj-35067-12911143.pdf?src-supplier=Mouser, ComponentLink3URL=https://datasheet.ciiva.com/12911/tlj-35067-12911143.pdf?src-supplier=Mouser, ComponentLink4Description=https://datasheet.ciiva.com/11229/tlj-11229391.pdf?src-supplier=Avnet, ComponentLink4URL=https://datasheet.ciiva.com/11229/tlj-11229391.pdf?src-supplier=Avnet, ComponentLink5Description=https://datasheet.ciiva.com/6238/tlj-6238526.pdf?src-supplier=Digi-Key, ComponentLink5URL=https://datasheet.ciiva.com/6238/tlj-6238526.pdf?src-supplier=Digi-Key, Construction=Flat, Depth=2.8mm, Features="General Purpose", Height=2.1mm, Height - Seated (Max)=0.083inch, Item Type=Capacitor, Length=3.5mm, Manufacturer Part Number=TLJB227M006R0500, Mounting Technology="Surface Mount", Packaging="Tape and Reel", Pins=2, Polarity=Polar, Pricing 1="2000=0.5308 (USD)", Radiation Hardening=No, Reach SVHC Compliant=No, RoHS=Yes, RoHS Compliant=Yes, Series=TLJ, Stock 1=2000, Supplier 1="Arrow Electronics", Supplier Part Number 1=TLJB227M006R0500, Termination=SMD/SMT, Voltage Rating (DC)=6.3V, Width=2.8mm
C95: library part UMK105CBJ105MV-F, "CAP CER 1UF 50V X5R 0402", LCSC Part Number=C2880413, Manufacturer="Taiyo Yuden", Supplier Part Number 1=587-6278-1-ND, ComponentLink1Description=http://www.farnell.com/datasheets/2801300.pdf?src-supplier=Newark, ComponentLink1URL=http://www.farnell.com/datasheets/2801300.pdf?src-supplier=Newark, ComponentLink2Description=http://www.farnell.com/datasheets/2801300.pdf?src-supplier=Farnell, ComponentLink2URL=http://www.farnell.com/datasheets/2801300.pdf?src-supplier=Farnell, ComponentLink3Description="https://ds.yuden.co.jp/TYCOMPAS/ut/detail?pn=UMK105CBJ105MV-F &amp;u=M&src-supplier=Digi-Key", ComponentLink3URL="https://ds.yuden.co.jp/TYCOMPAS/ut/detail?pn=UMK105CBJ105MV-F &amp;u=M&src-supplier=Digi-Key", Item Type=Capacitor, Lead Free="Lead Free", Manufacturer Part Number=UMK105CBJ105MV-F, Pricing 1="1=0.27, 10=0.184, 50=0.1224, 100=0.104, 500=0.07342, 1000=0.06424, 2500=0.06118, 5000=0.05659 (USD)", RoHS Compliant=Yes, Stock 1=412061, Supplier 1=Digi-Key